# Altium PCB SFY_ADA_4G_PCB.PcbDoc (part 1 of 2)
Units mm, origin at the board's own origin, x right, y up, seen from the top; angles counter-clockwise.
Board outline 69 x 58.5 mm, 4 copper layers (Top Layer, Layer 2, Layer 3, Bottom Layer), stack 1.74 mm thick; 131 components, 96 nets, 524 pads, 176 vias.
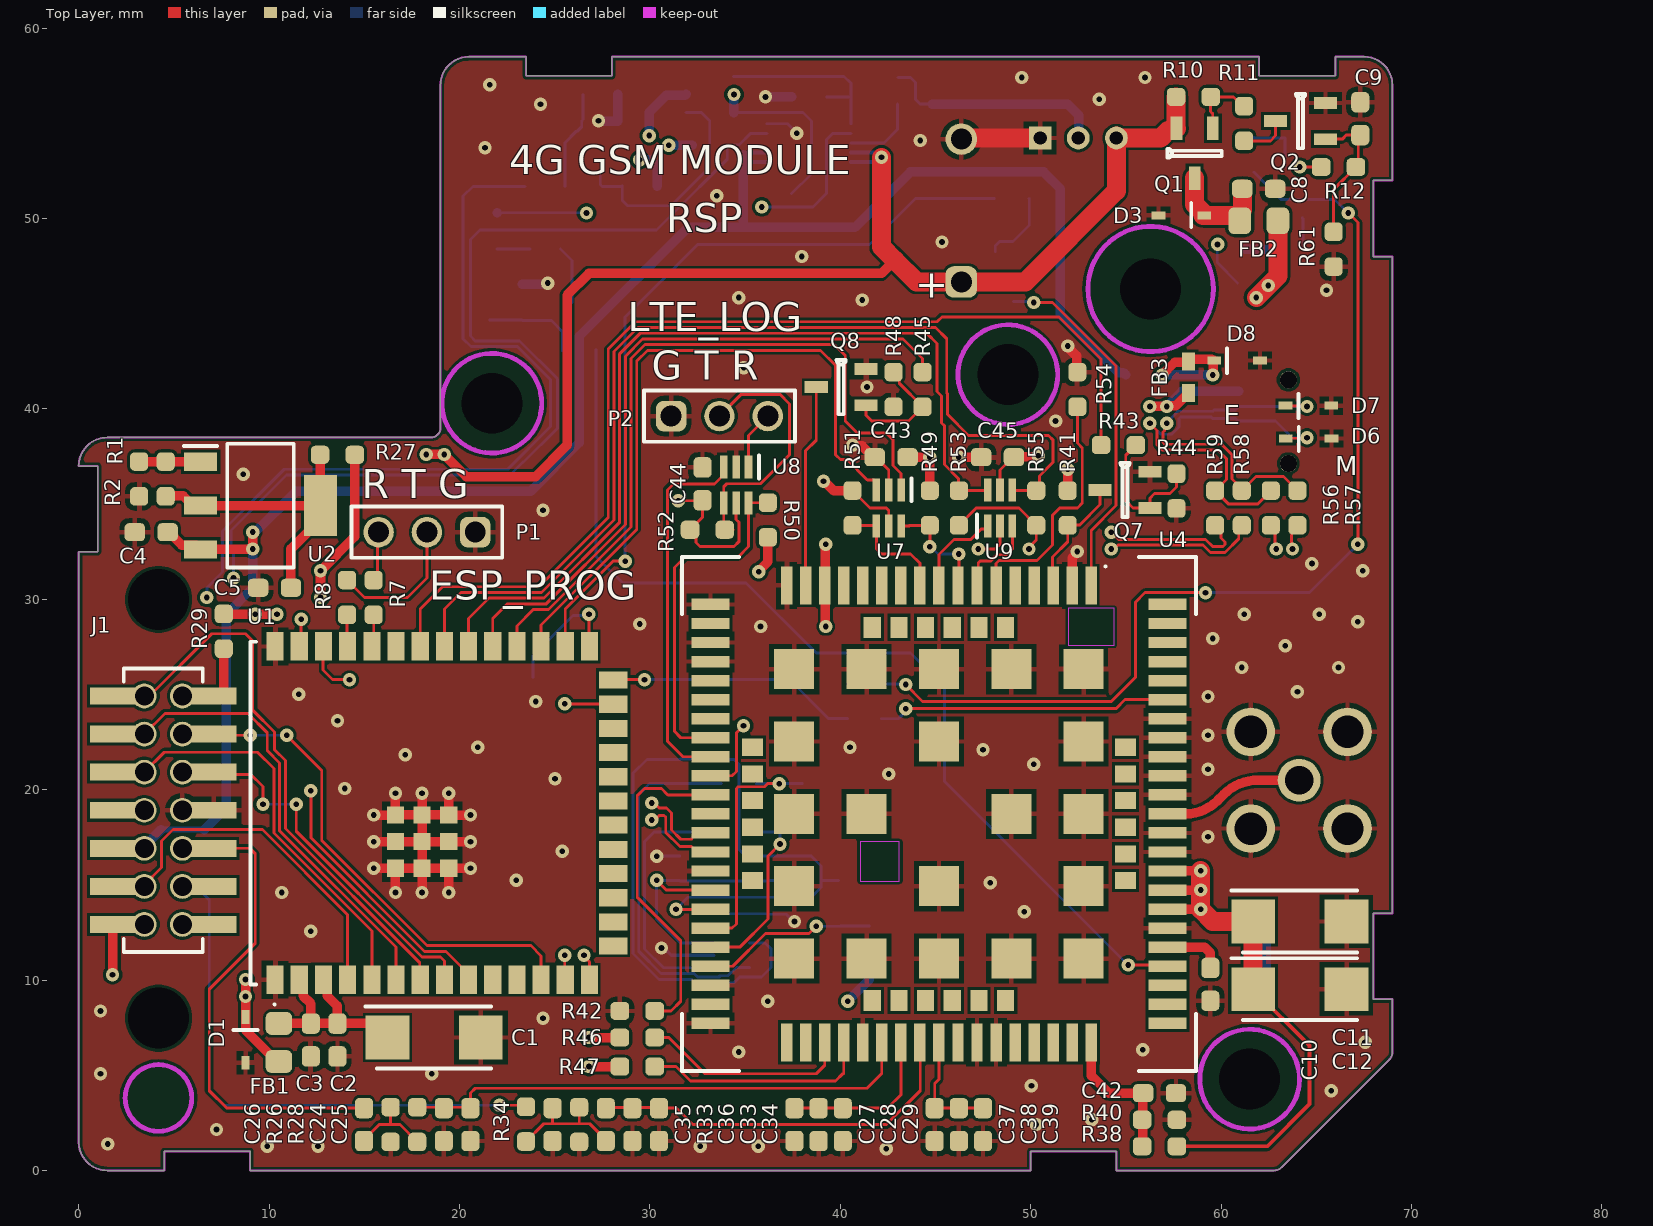
[diagram p0: Top Layer view]
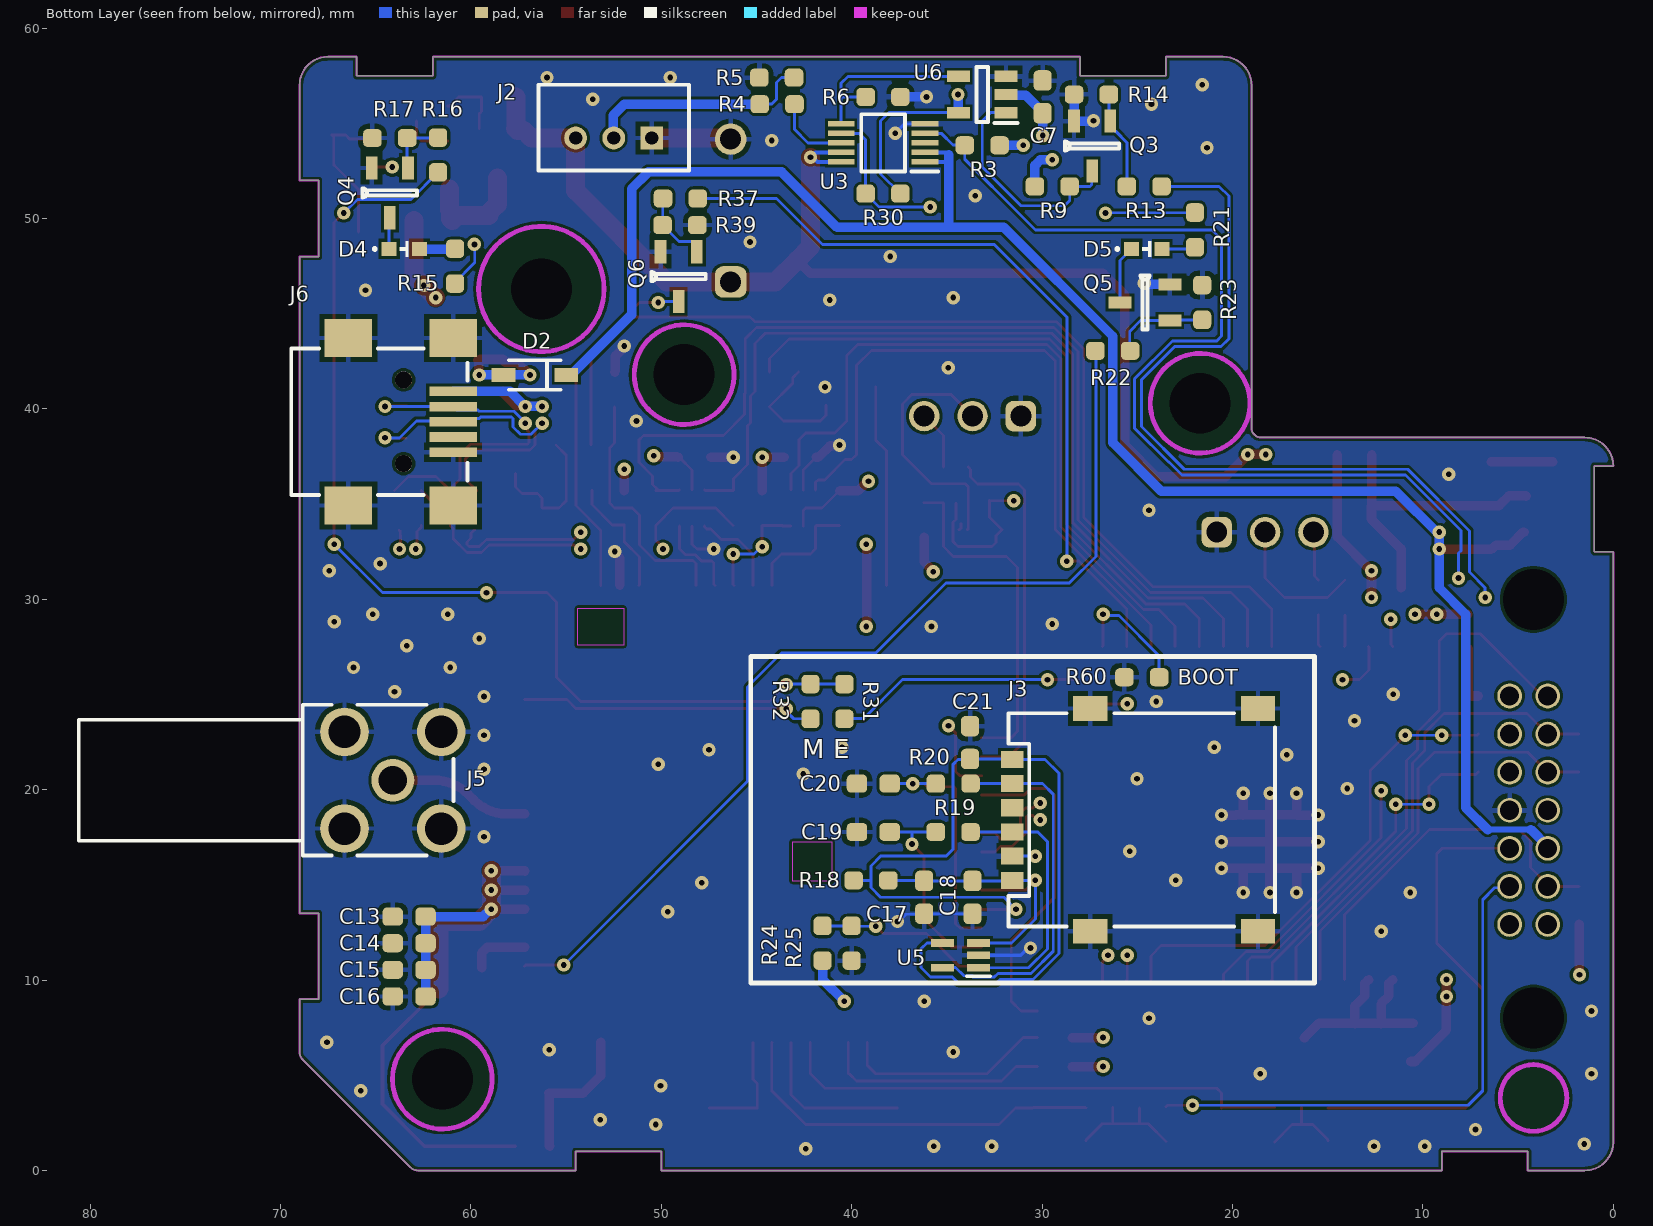
[diagram p1: Bottom Layer view, seen from below]
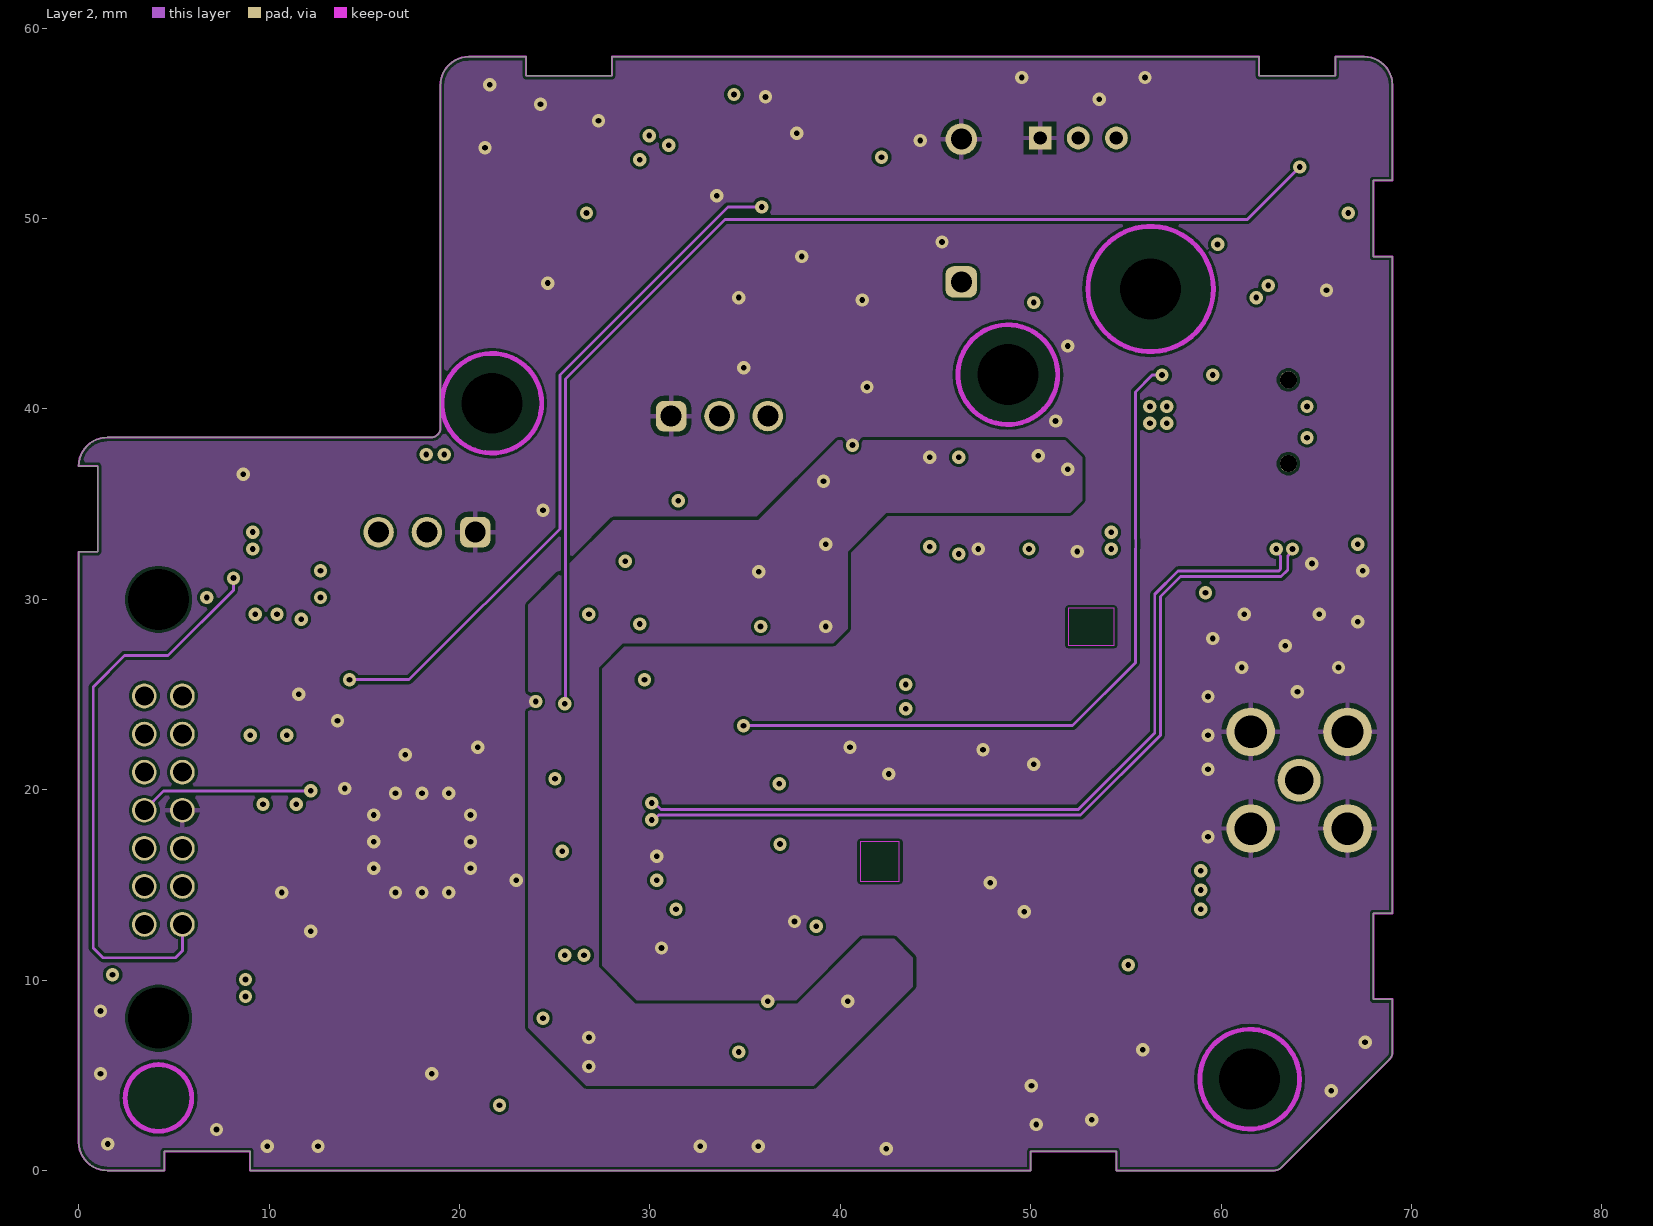
[diagram p2: Layer 2]
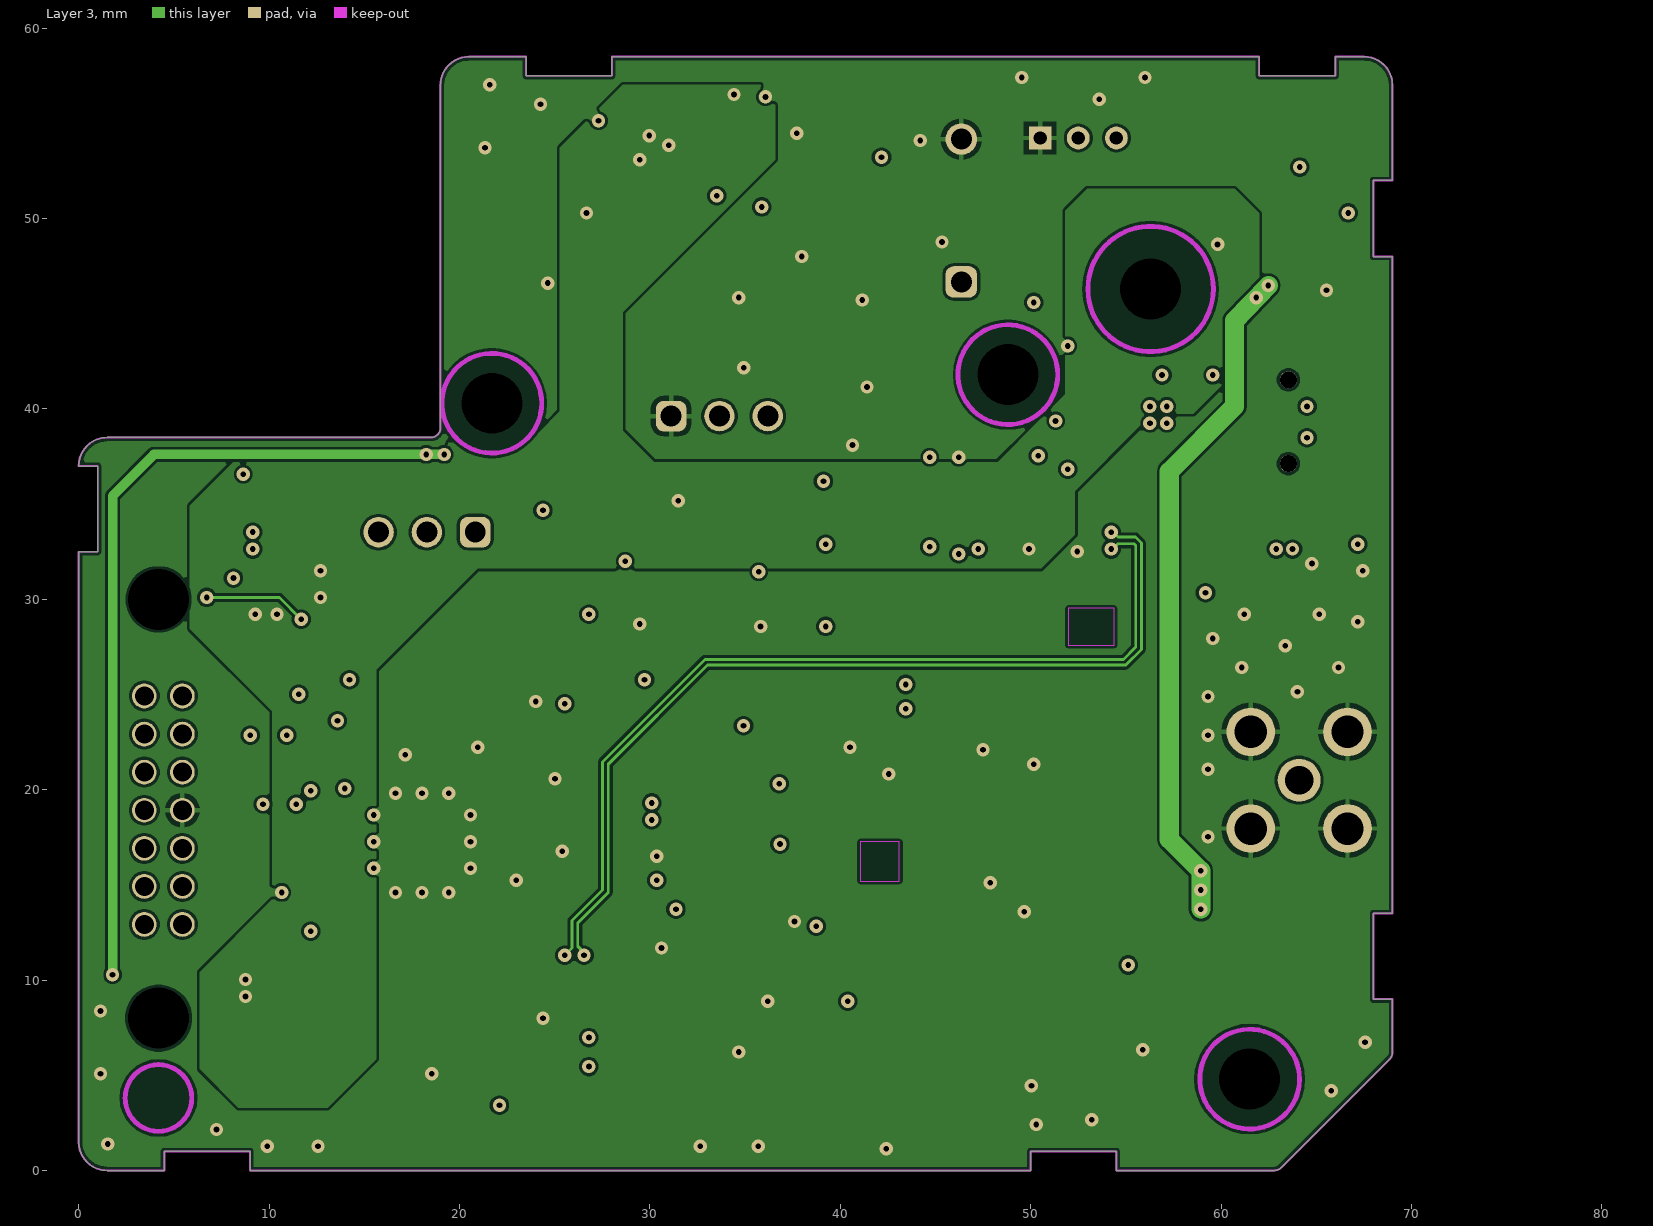
[diagram p3: Layer 3]
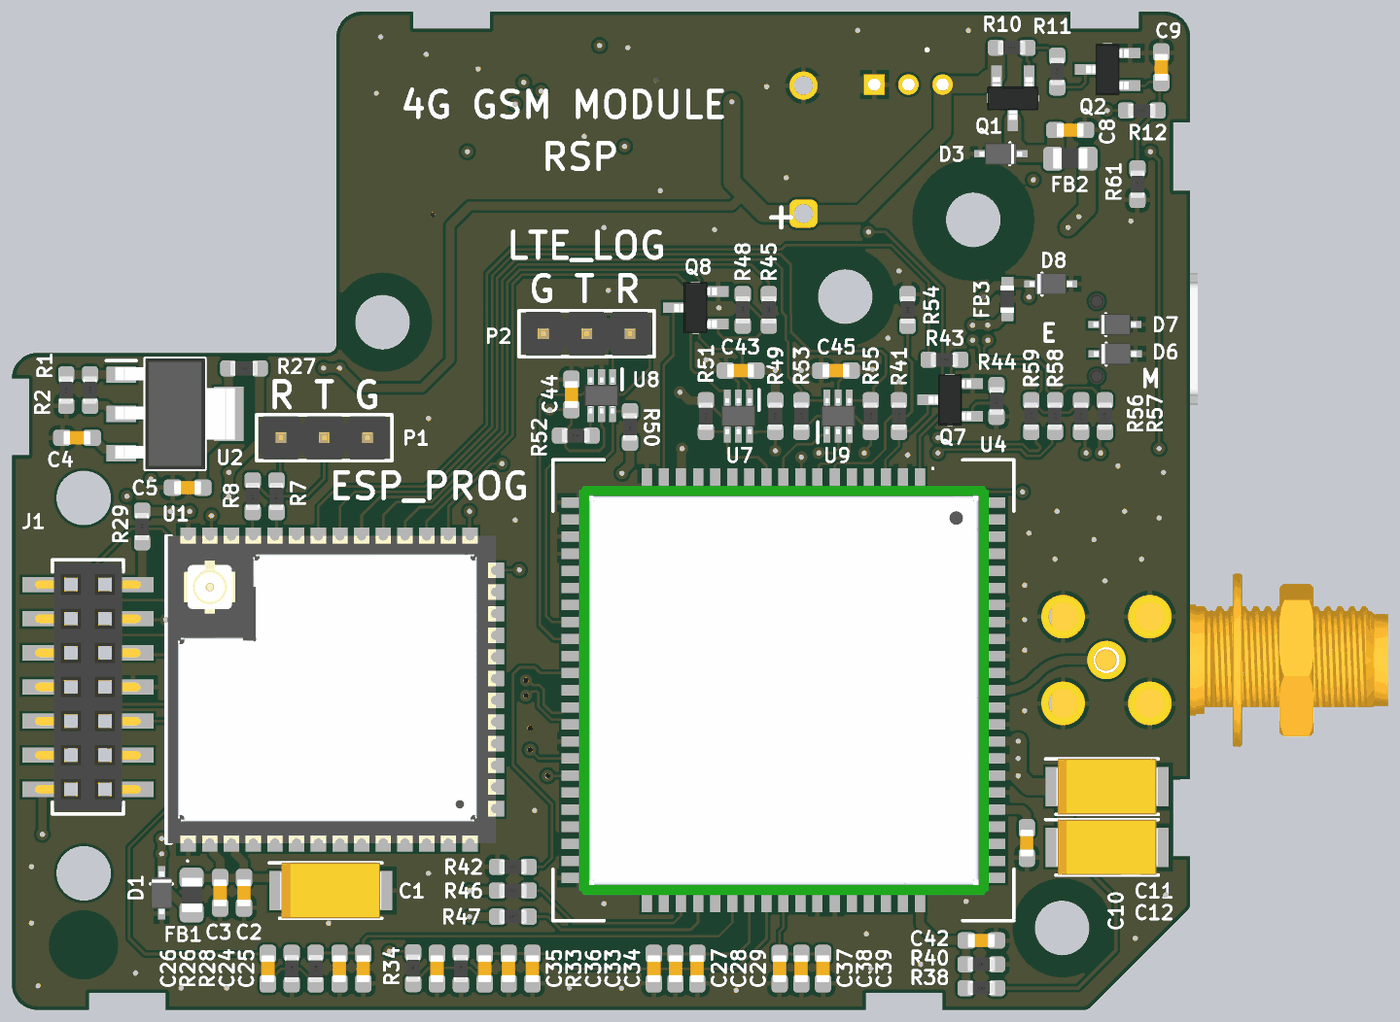
[diagram p5: 3D render of the assembled board from above, using the file's embedded part models]
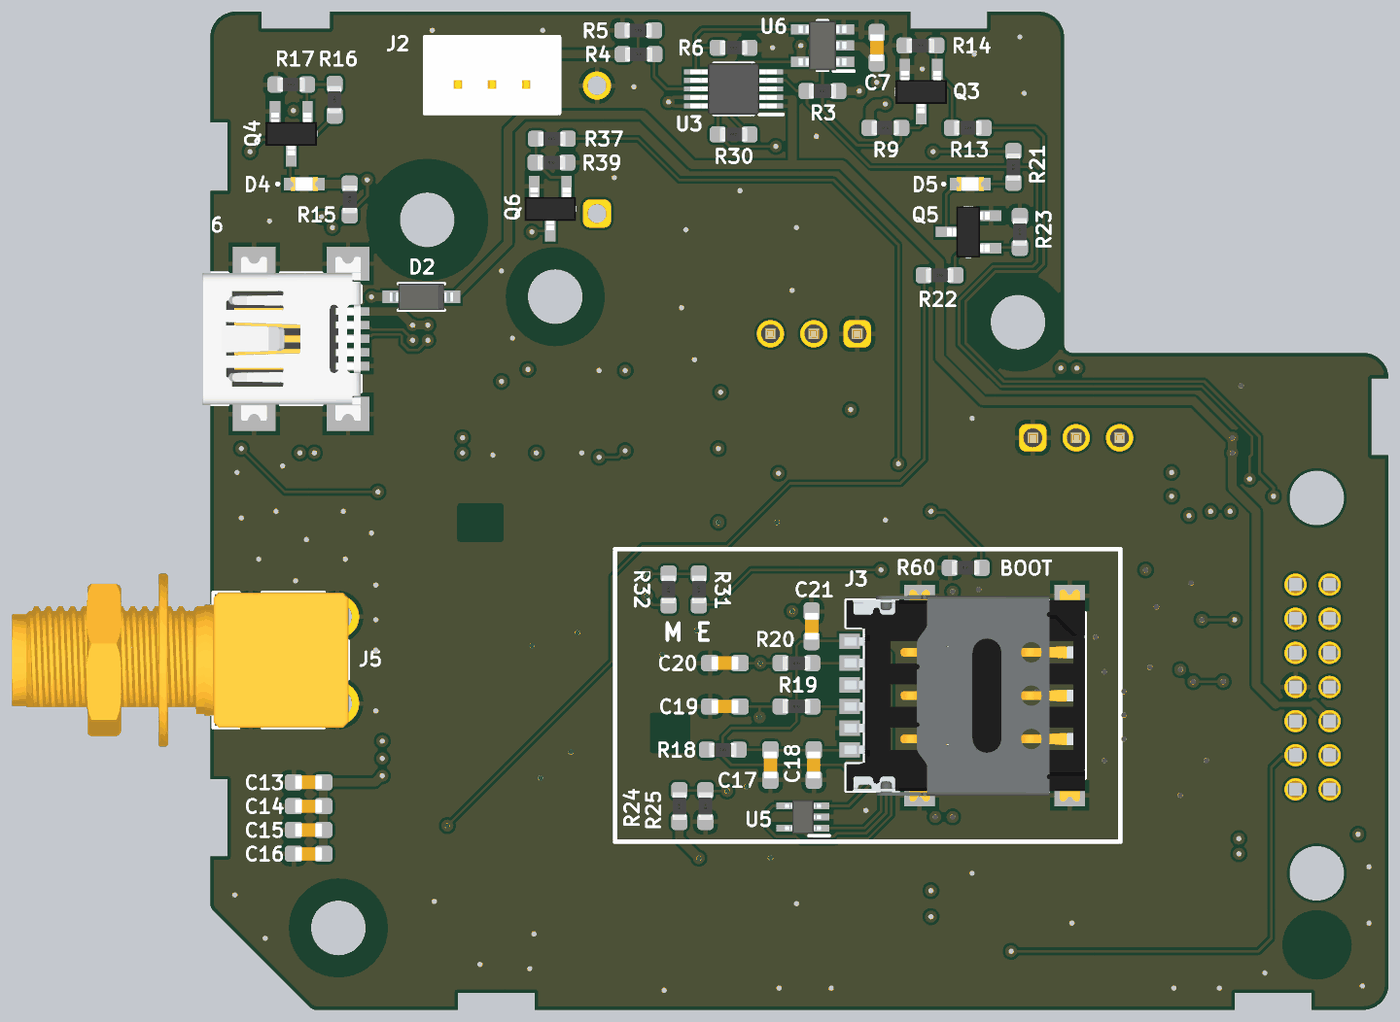
[diagram p6: 3D render of the assembled board from below, using the file's embedded part models]

## Layer stack, top to bottom
Top Solder: solder mask 0.01, Solder Resist, Dk 3.5
Top Layer: signal copper 0.035
Dielectric 2: prepreg 0.3, PP-006, Dk 4.1
Layer 2: signal copper 0.035
Dielectric 1: dielectric 1, FR-4, Dk 4.8
Layer 3: signal copper 0.035
Dielectric 3: prepreg 0.3, PP-006, Dk 4.1
Bottom Layer: signal copper 0.035
Bottom Solder: solder mask 0.01, Solder Resist, Dk 3.5

## Board outline
0,32.5 1,32.5 1,37 0,37 cw(c1.5,37) 1.5,38.5 18.5,38.5 ccw(c18.5,39) 19,39 19,57 cw(c20.5,57) 20.5,58.5 23.5,58.5 23.5,57.5 28,57.5 28,58.5 62,58.5 62,57.5 66,57.5 66,58.5 67.5,58.5 cw(c67.5,57) 69,57 69,52 68,52 68,48 69,48 69,13.5 68,13.5 68,9 69,9 69,6.205 cw(c68.5,6.205) 68.854,5.851 68.853,5.852 63.148,0.146 cw(c62.794,0.5) 62.794,0 54.5,0 54.5,1 50,1 50,0 9,0 9,1 4.5,1 4.5,0 1.5,0 cw(c1.5,1.5) 0,1.5

## Design rules (kind name [scope] priority, off if disabled: settings)
Clearance [All] p1: gap=0.15 ignorepadtopadclearanceinfootprint=FALSE
HoleSize [All] p1: absolutevalues=TRUE maxlimit=5 minlimit=0.3 maxpercent=80.000 minpercent=20.000
MinimumSolderMaskSliver [All] p1: minsoldermaskwidth=0.15
PolygonConnect [All] p1: connectstyle=Relief reliefconductorwidth=0.254 reliefentries=4 polygonreliefangle="90 Angle" airgapwidth=0.254
RoutingVias [All] p1: holewidth=0.3 width=0.7 viastyle="Through Hole" minholewidth=0.3 minwidth=0.7 maxholewidth=0.711 maxwidth=1.27
SilkToSilkClearance [All] p1: silktosilkclearance=0.15
SilkToSolderMaskClearance [IsPad] p1: minsilkscreentomaskgap=0.15 clearancetoexposedcopper=TRUE
SolderMaskExpansion [All] p1: expansion=0 istentingtop=FALSE
SupplyNets "Schematic Supply Nets_7" [InNet('+1.8V')] p1: voltage=0.000
SupplyNets "Schematic Supply Nets_6" [InNet('VBAT_MOD')] p2: voltage=0.000
SupplyNets "Schematic Supply Nets_5" [InNet('V_USB')] p3: voltage=0.000
SupplyNets "Schematic Supply Nets_4" [InNet('+3.3V')] p4: voltage=0.000
SupplyNets "Schematic Supply Nets_3" [InNet('VBAT')] p5: voltage=0.000
SupplyNets "Schematic Supply Nets_2" [InNet('GND')] p6: voltage=0.000
SupplyNets "Schematic Supply Nets_1" [InNet('VBAT_A')] p7: voltage=0.000
SupplyNets "Schematic Supply Nets" [InNet('VEXT_4.5V')] p8: voltage=0.000
Width [All] p1: maxlimit=3 minlimit=0.15 preferedwidth=0.15
26 further rules are at their usual default settings.

## Classes and differential pairs
component class 01_ESP: C1 C2 C3 D1 FB1 P1 R7 R8 R60 U1
component class 03_MODEM_2: C42 C43 C44 C45 D6 D7 D8 FB3 J5 J6 P2 Q6 Q7 Q8 R37 R38 R39 R40 R41 R42 R43 R44 R45 R46 R47 R48 R49 R50 R51 R52 R53 R54 R55 R56 R57 R58 R59 U7 U8 U9
component class 02_MODEM_1: C10 C11 C12 C13 C14 C15 C16 C17 C18 C19 C20 C21 C24 C25 C26 C27 C28 C29 C33 C34 C35 C36 C37 C38 C39 D3 D4 D5 FB2 J3 Q4 Q5 R15 R16 R17 R18 R19 R20 R21 R22 R23 R24 R25 R26 R28 R31 R32 R33 R34 U4 U5
component class 00_CHG_POWER: C4 C5 C7 C8 C9 D2 J1 J2 Q1 Q2 Q3 R1 R2 R3 R4 R5 R6 R9 R10 R11 R12 R13 R14 R27 R29 R30 R61 U2 U3 U6

## Components (designator, comment, footprint, x,y, rotation, side; value= is the part's Value field where it differs from the comment)
C1 "TPSC107K010S0075" CAPPM6032X280N 18.669,6.985 r0 top
C2 "1uF" C_0603_H_0.8_M 13.589,6.858 r270 top
C3 "100nF" C_0603_H_0.8_M 12.192,6.858 r270 top
C4 "100nF" C_0603_H_0.8_M 3.81,33.528 r180 top
C5 "100nF" C_0603_H_0.8_M 10.287,30.607 r180 top
C7 "100nF" C_0603_H_0.8_M 29.972,56.388 r270 bottom
C8 "33pF" C_0603_H_0.8_M 61.976,51.562 r180 top
C9 "33pF" C_0603_H_0.8_M 67.31,55.245 r270 top
C10 "10pF" C_0603_H_0.8_M 59.436,9.779 r270 top
C11 "TPSC107K010S0075" CAPPM6032X280N 64.135,13.081 r0 top
C12 "TPSC107K010S0075" CAPPM6032X280N 64.135,9.525 r0 top
C13 "10pF" C_0603_H_0.8_M 63.246,13.335 r0 bottom
C14 "33pF" C_0603_H_0.8_M 63.246,11.938 r0 bottom
C15 "33pF" C_0603_H_0.8_M 63.246,10.541 r0 bottom
C16 "1uF" C_0603_H_0.8_M 63.246,9.144 r0 bottom
C17 "33pF" C_0603_H_0.8_M 36.195,14.351 r90 bottom
C18 "100nF" C_0603_H_0.8_M 33.655,14.351 r90 bottom
C19 "33pF" C_0603_H_0.8_M 38.862,17.78 r0 bottom
C20 "33pF" C_0603_H_0.8_M 38.862,20.32 r0 bottom
C21 "33pF" C_0603_H_0.8_M 33.782,22.479 r270 bottom
C24 "NC" C_0603_H_0.8_M 19.177,2.413 r270 top
C25 "33pF" C_0603_H_0.8_M 20.574,2.413 r270 top
C26 "100nF" C_0603_H_0.8_M 14.986,2.413 r90 top
C27 "NC" C_0603_H_0.8_M 37.592,2.413 r90 top
C28 "33pF" C_0603_H_0.8_M 38.862,2.413 r90 top
C29 "120nF" C_0603_H_0.8_M 40.132,2.413 r90 top
C33 "NC" C_0603_H_0.8_M 29.083,2.413 r270 top
C34 "33pF" C_0603_H_0.8_M 30.48,2.413 r270 top
C35 "120nF" C_0603_H_0.8_M 24.892,2.413 r270 top
C36 "33pF" C_0603_H_0.8_M 27.686,2.413 r90 top
C37 "NC" C_0603_H_0.8_M 44.958,2.413 r90 top
C38 "33pF" C_0603_H_0.8_M 46.228,2.413 r90 top
C39 "120nF" C_0603_H_0.8_M 47.498,2.413 r90 top
C42 "1uF" C_0603_H_0.8_M 56.769,4.064 r180 top
C43 "100nF" C_0603_H_0.8_M 42.672,37.465 r0 top
C44 "100nF" C_0603_H_0.8_M 32.766,36.068 r270 top
C45 "100nF" C_0603_H_0.8_M 48.26,37.465 r0 top
D1 "XBP1013-G" SOD-323-2 8.763,6.858 r270 top
D2 "PMEG2010ER" SOD3716X135N 56.642,41.783 r0 bottom
D3 "XBP1013-G" SOD-323-2 57.912,50.165 r180 top
D4 "Green, 3.2V, 140°" WL-SMCD_0603 63.5,48.4 r180 bottom locked
D5 "Green, 3.2V, 140°" WL-SMCD_0603 24.5,48.4 r180 bottom locked
D6 "XBP1013-G" SOD-323-2 64.601,38.443 r0 top
D7 "XBP1013-G" SOD-323-2 64.587,40.167 r0 top
D8 "XBP1013-G" SOD-323-2 60.84,42.545 r0 top
FB1 "BLM21PG300SN1D" F_0805_H_1.1_M 10.541,6.731 r90 top
FB2 "BLM21PG300SN1D" F_0805_H_1.1_M 61.976,49.911 r180 top
FB3 "600Ω" WE-CBF_0603_L1.6W0.8H0.8_HC 58.293,41.656 r90 top
J1 "621014242921" 621014242921 4.445,18.923 r90 top
J2 "B3B-PH-K-S" B3BPHKS 50.5,54.229 r180 bottom
J3 "693042010611" 693042010611 24.765,18.415 r90 bottom locked
J5 "60311042114502" 60311042114502 64.1,20.5 r270 bottom locked
J6 "65100516121" 65100516121 64.809,39.326 r270 bottom locked
P1 "61300311121" 61300311121 18.288,33.528 r180 top
P2 "61300311121" 61300311121 33.655,39.624 r0 top
Q1 "SI2369" SOT23-3 59.563,54.737 r90 top
Q2 "SI2300" SOT23-3 65.485,54.168 r0 top
Q3 "SI2300" SOT23-3 26.421,55.118 r90 bottom
Q4 "SI2300" SOT23-3 63.312,52.658 r90 bottom
Q5 "SI2300" SOT23-3 23.288,44.643 r180 bottom
Q6 "SI2300" SOT23-3 48.138,48.26 r90 bottom
Q7 "SI2300" SOT23-3 56.261,34.798 r0 top
Q8 "SI2300" SOT23-3 41.355,40.198 r0 top
R1 "NC" R_0603_H_0.45_M 4.572,36.322 r270 top
R2 "0R" R_0603_H_0.45_M 3.175,36.322 r90 top
R3 "4.7K" R_0603_H_0.45_M 33.147,53.848 r180 bottom
R4 "8.2K" R_0603_H_0.45_M 43.918,56.007 r0 bottom
R5 "10K" R_0603_H_0.45_M 43.942,57.404 r180 bottom
R6 "2.2K" R_0603_H_0.45_M 38.354,56.388 r180 bottom
R7 "100R" R_0603_H_0.45_M 15.494,30.099 r90 top
R8 "100R" R_0603_H_0.45_M 14.097,30.099 r90 top
R9 "10K" R_0603_H_0.45_M 29.464,51.689 r180 bottom
R10 "47K" R_0603_H_0.45_M 58.547,56.388 r180 top
R11 "4.7K" R_0603_H_0.45_M 61.214,54.991 r270 top
R12 "100R" R_0603_H_0.45_M 66.167,52.705 r180 top
R13 "100R" R_0603_H_0.45_M 24.638,51.689 r0 bottom
R14 "NC" R_0603_H_0.45_M 27.408,56.515 r0 bottom
R15 "220R" R_0603_H_0.45_M 60.833,47.498 r90 bottom
R16 "100R" R_0603_H_0.45_M 61.722,53.34 r90 bottom
R17 "NC" R_0603_H_0.45_M 64.262,54.229 r0 bottom
R18 "4.7K" R_0603_H_0.45_M 38.989,15.24 r0 bottom
R19 "22R" R_0603_H_0.45_M 34.671,17.78 r180 bottom
R20 "22R" R_0603_H_0.45_M 34.671,20.32 r180 bottom
R21 "220R" R_0603_H_0.45_M 21.971,49.403 r270 bottom
R22 "100R" R_0603_H_0.45_M 26.289,43.053 r180 bottom
R23 "NC" R_0603_H_0.45_M 21.59,45.593 r90 bottom
R24 "NC" R_0603_H_0.45_M 41.529,11.938 r90 bottom
R25 "NC" R_0603_H_0.45_M 40.005,11.938 r90 bottom
R26 "4.7K" R_0603_H_0.45_M 16.383,2.413 r90 top
R27 "0R" R_0603_H_0.45_M 13.589,37.592 r180 top
R28 "220R" R_0603_H_0.45_M 17.78,2.413 r90 top
R29 "NC" R_0603_H_0.45_M 7.62,28.321 r270 top
R30 "4.7K" R_0603_H_0.45_M 38.354,51.308 r180 bottom
R31 "0R" R_0603_H_0.45_M 40.386,24.638 r90 bottom
R32 "NC" R_0603_H_0.45_M 42.164,24.638 r90 bottom
R33 "3.3K" R_0603_H_0.45_M 26.289,2.413 r90 top
R34 "18K" R_0603_H_0.45_M 23.495,2.437 r90 top
R37 "100R" R_0603_H_0.45_M 48.998,51.054 r0 bottom
R38 "680K" R_0603_H_0.45_M 56.769,1.27 r0 top
R39 "NC" R_0603_H_0.45_M 49.022,49.657 r180 bottom
R40 "470K" R_0603_H_0.45_M 56.769,2.667 r0 top
R41 "4.7K" R_0603_H_0.45_M 51.943,34.798 r90 top
R42 "10K" R_0603_H_0.45_M 29.337,8.382 r0 top
R43 "100R" R_0603_H_0.45_M 54.61,38.1 r0 top
R44 "NC" R_0603_H_0.45_M 57.658,35.687 r270 top
R45 "100R" R_0603_H_0.45_M 44.323,41.021 r270 top
R46 "4.7K" R_0603_H_0.45_M 29.337,6.985 r0 top
R47 "4.7K" R_0603_H_0.45_M 29.337,5.461 r0 top
R48 "NC" R_0603_H_0.45_M 42.799,41.021 r270 top
R49 "4.7K" R_0603_H_0.45_M 44.704,34.798 r90 top
R50 "4.7K" R_0603_H_0.45_M 36.195,34.163 r270 top
R51 "4.7K" R_0603_H_0.45_M 40.64,34.798 r90 top
R52 "4.7K" R_0603_H_0.45_M 33.02,33.655 r180 top
R53 "4.7K" R_0603_H_0.45_M 46.228,34.798 r270 top
R54 "NC" R_0603_H_0.45_M 52.451,41.021 r270 top
R55 "4.7K" R_0603_H_0.45_M 50.292,34.798 r270 top
R56 "NC" R_0603_H_0.45_M 62.611,34.798 r270 top
R57 "NC" R_0603_H_0.45_M 64.008,34.798 r270 top
R58 "0R" R_0603_H_0.45_M 61.087,34.798 r90 top
R59 "0R" R_0603_H_0.45_M 59.69,34.798 r90 top
R60 "NC" R_0603_H_0.45_M 24.765,25.908 r0 bottom
R61 "10K" R_0603_H_0.45_M 65.913,48.387 r270 top
U1 "ESP32-S3-WROOM-1" ESP32-S3-WROOM-1U 28.327,9.775 r90 top locked
U2 "LM1117-33" SOT230P700X180-4N 9.55,34.925 r0 top
U3 "MCP73833-AMI_UN" SOP50P490X110-10N 38.354,53.975 r0 bottom
U4 "A7670E" A7670CLNSC 57.181,30.731 r270 top locked
U5 "ESDA6V1W5" SOT65P210X110-5N 34.29,11.303 r0 bottom
U6 "74LVC1G125DBVRE4" SOT95P280X145-5N 33.147,56.515 r0 bottom
U7 "NC7WZ07P6" SOT65P210X110-6N 42.545,34.798 r270 top
U8 "NC7WZ07P6" SOT65P210X110-6N 34.529,36.002 r270 top
U9 "NC7WZ07P6" SOT65P210X110-6N 48.387,34.798 r90 top

## Footprints (in the part's own frame and the unit in brackets; to place one, negate y for a bottom-side part, rotate by r counter-clockwise, add the part's x,y. Pads: shape width x height; smd on the part's side, far side on the other; paste and mask are expansions set on the pad)
61300311121 [mm] "Pin Header, pitch 2.54 mm, THT, Vertical, single row, 3p"
  rrect50% 1.6x1.6 hole 1.1: 1(-2.54,0)
  round 1.6 hole 1.1: 2(0,0) 3(2.54,0)
  silkscreen extent -3.96,-1.35 3.96,1.35, body extent -3.81,-1.27 3.81,1.27, height 8.57
65100516121 [mm] "Mini USB 2.0 Type B SMT Horizontal 5 Contacts"
  rect 0.5x2.5 smd: 1(-1.6,3.875) 2(-0.8,3.875) 3(0,3.875) 4(0.8,3.875) 5(1.6,3.875)
  round 0.9 hole 0.9 unplated: MH1(-2.2,1.275) MH2(2.2,1.275)
  rect 2x2.5 smd: Shell(-4.4,-1.625) Shell(-4.4,3.875) Shell(4.4,-1.625) Shell(4.4,3.875)
  silkscreen extent -3.85,-4.62 3.85,4.62, body extent -4.8,-4.62 4.8,4.63, height 3.92
621014242921 [mm] "Socket Header, Pitch 2.00 mm, SMT, Vertical, dual row, 14p"
  rect 0.89x2.4 smd: 1(-6,-2.65) 2(-6,2.65) 3(-4,-2.65) 4(-4,2.65) 5(-2,-2.65) 6(-2,2.65) 7(0,-2.65) 8(0,2.65) 9(2,-2.65) 10(2,2.65) 11(4,-2.65) 12(4,2.65) 13(6,-2.65) 14(6,2.65)
  round 1.3 hole 1: M1(-6,-1) M2(-6,1) M3(-4,-1) M4(-4,1) M5(-2,-1) M6(-2,1) M7(0,-1) M8(0,1) M9(2,-1) M10(2,1) M11(4,-1) M12(4,1) M13(6,-1) M14(6,1)
  silkscreen extent -7.45,-2.07 7.45,2.08, body extent -7.25,-3.1 7.25,3.1, height 4.6
693042010611 [mm] "NanoSIM Hinge SMT"
  rect 0.9x1.2 smd: C1(-3.175,6.8) C2(-0.635,6.8) C3(1.905,6.8) C5(-1.905,6.8) C6(0.635,6.8) C7(3.175,6.8)
  rect 1.3x1.8 smd: Shell(-5.85,-6.1) Shell(-5.85,2.7) Shell(5.85,-6.1) Shell(5.85,2.7)
  silkscreen extent -5.6,-7 5.6,7, body extent -6.2,-7 6.2,7.1, height 1.51
60311042114502 [mm] "SMA PCB THT Jack Right Angle  Rear Mount Bulkhead"
  round 2.25 hole 1.5: 1(0,0)
  round 2.55 hole 1.7: 2(-2.54,2.54) 3(2.54,2.54) 4(2.54,-2.54) 5(-2.54,-2.54)
  silkscreen extent -3.96,-16.5 3.96,3.19, body extent -5.09,-16.5 5.1,3.19, height 12.16
A7670CLNSC [mm]
  rect 2x0.6 smd: 1(0,-4) 2(0,-5) 3(0,-6) 4(0,-7) 5(0,-8) 6(0,-9) 7(0,-10) 8(0,-11) 9(0,-12) 10(0,-13) 11(0,-14) 12(0,-15) 13(0,-16) 14(0,-17) 15(0,-18) 16(0,-19) 17(0,-20) 35(24,-20) 36(24,-19) 37(24,-18) 38(24,-17) 39(24,-16) 40(24,-15) 41(24,-14) 42(24,-13) 43(24,-12) 44(24,-11) 45(24,-10) 46(24,-9) 47(24,-8) 48(24,-7) 49(24,-6) 50(24,-5) 51(24,-4)
  rect 0.6x2 smd: 18(4,-24) 19(5,-24) 20(6,-24) 21(7,-24) 22(8,-24) 23(9,-24) 24(10,-24) 25(11,-24) 26(12,-24) 27(13,-24) 28(14,-24) 29(15,-24) 30(16,-24) 31(17,-24) 32(18,-24) 33(19,-24) 34(20,-24) 52(20,0) 53(19,0) 54(18,0) 55(17,0) 56(16,0) 57(15,0) 58(14,0) 59(13,0) 60(12,0) 61(11,0) 62(10,0) 63(9,0) 64(8,0) 65(7,0) 66(6,0) 67(5,0) 68(4,0) 89(1,-24) 90(2,-24) 91(3,-24) 92(21,-24) 93(22,-24) 94(23,-24) 95(23,0) 96(22,0) 97(21,0) 98(3,0) 99(2,0) 100(1,0)
  rect 2.1x2.1 smd: 69(4.4,-4.4) 70(4.4,-8.2) 71(4.4,-12) 72(4.4,-15.8) 73(4.4,-19.6) 74(8.2,-19.6) 75(12,-19.6) 76(15.8,-19.6) 77(19.6,-19.6) 78(19.6,-15.8) 79(19.6,-12) 80(19.6,-8.2) 81(19.6,-4.4) 82(15.8,-4.4) 83(12,-4.4) 84(8.2,-4.4) 85(8.2,-12) 86(12,-15.8) 87(15.8,-12) 88(12,-8.2)
  rect 1.1x0.9 smd: 101(2.2,-8.5) 102(2.2,-9.9) 103(2.2,-11.3) 104(2.2,-12.7) 105(2.2,-14.1) 106(2.2,-15.5) 113(21.8,-15.5) 114(21.8,-14.1) 115(21.8,-12.7) 116(21.8,-11.3) 117(21.8,-9.9) 118(21.8,-8.5)
  rect 0.9x1.1 smd: 107(8.5,-21.8) 108(9.9,-21.8) 109(11.3,-21.8) 110(12.7,-21.8) 111(14.1,-21.8) 112(15.5,-21.8) 119(15.5,-2.2) 120(14.1,-2.2) 121(12.7,-2.2) 122(11.3,-2.2) 123(9.9,-2.2) 124(8.5,-2.2)
  Keep-Out Layer region: 1.2,-5.2 3.15,-5.2 3.15,-2.8 1.2,-2.8
  Keep-Out Layer region: 13.475,-16.125 15.525,-16.125 15.525,-14.075 13.475,-14.075
  silkscreen extent -1.5,-25.5 25.5,1.5, body extent 0.01,-23.98 24.01,0.02, height 2.7
B3BPHKS [mm]
  rect 1.2x1.2 hole 0.7: 1(0,0)
  round 1.2 hole 0.7: 2(-2,0) 3(-4,0)
  silkscreen extent -5.95,-1.7 1.95,2.8, body extent -5.95,-1.7 1.95,2.8, height 6
C_0603_H_0.8_M [mm] "Ceramic Capacitors, body 1.6x0.8mm"
  rrect50% 1.075x0.95 smd: 1(0.863,0) 2(-0.863,0)
  body extent -0.8,-0.4 0.8,0.4, height 0.8
CAPPM6032X280N [mm]
  rect 2.3x2.3 smd: 1(-2.45,0) 2(2.45,0)
  silkscreen extent -3.6,-1.63 3,1.63, body extent -3,-1.63 3,1.63, height 2.8
ESP32-S3-WROOM-1U [mm]
  rect 1.5x0.9 smd: 1(0.25,18.01) 2(0.25,16.74) 3(0.25,15.47) 4(0.25,14.2) 5(0.25,12.93) 6(0.25,11.66) 7(0.25,10.39) 8(0.25,9.12) 9(0.25,7.85) 10(0.25,6.58) 11(0.25,5.31) 12(0.25,4.04) 13(0.25,2.77) 14(0.25,1.5) 27(17.75,1.5) 28(17.75,2.77) 29(17.75,4.04) 30(17.75,5.31) 31(17.75,6.58) 32(17.75,7.85) 33(17.75,9.12) 34(17.75,10.39) 35(17.75,11.66) 36(17.75,12.93) 37(17.75,14.2) 38(17.75,15.47) 39(17.75,16.74) 40(17.75,18.01)
  rect 0.9x1.5 smd: 15(2.015,0.25) 16(3.285,0.25) 17(4.555,0.25) 18(5.825,0.25) 19(7.095,0.25) 20(8.365,0.25) 21(9.635,0.25) 22(10.905,0.25) 23(12.175,0.25) 24(13.445,0.25) 25(14.715,0.25) 26(15.992,0.25)
  rect 0.9x0.9 smd: 41(7.5,8.89) 42(8.9,8.89) 43(8.9,10.29) 44(8.9,11.69) 45(7.5,11.69) 46(6.1,11.69) 47(6.1,10.29) 48(6.1,8.89) 49(7.5,10.29)
  silkscreen extent -1.1,17.99 18,19.3, body extent 0,0 18,19.2, height 3.35
F_0805_H_1.1_M [mm] "SMD EMI Suppression Ferrite  Bead, body 2.00x1.20mm"
  rrect50% 1.2x1.4 smd: 1(-1.004,0.025) 2(0.996,0.025)
  body extent -1,-0.6 1,0.6, height 0.9
R_0603_H_0.45_M [mm] "Thick Film Resistors, SMT, body size 1.60 x 0.80 mm"
  rrect50% 0.975x0.95 smd: 1(-0.913,0) 2(0.913,0)
  body extent -0.8,-0.4 0.8,0.4, height 0.45
SOD3716X135N [mm]
  rect 1.25x0.75 smd: 1(-1.65,0) 2(1.65,0)
  silkscreen extent -1.35,-0.77 1.35,0.77, body extent -1.85,-0.77 1.85,0.77, height 1.35
SOD-323-2 [mm]
  rect 0.72x0.42 smd: 1(1.2,0) 2(-1.2,0)
  silkscreen extent -0.53,-0.65 -0.53,0.63, body extent -1.25,-0.63 1.25,0.63, height 0.95
SOP50P490X110-10N [mm]
  rect 1.4x0.3 smd: 1(-2.2,1) 2(-2.2,0.5) 3(-2.2,0) 4(-2.2,-0.5) 5(-2.2,-1) 6(2.2,-1) 7(2.2,-0.5) 8(2.2,0) 9(2.2,0.5) 10(2.2,1)
  silkscreen extent -2.9,-1.5 1.15,1.5, body extent -2.52,-1.5 2.52,1.5, height 1.1
SOT23-3 [mm]
  rect 1.22x0.62 smd: 1(0,0) 2(0,1.9) 3(-2.62,0.95)
  silkscreen extent -1.55,-0.48 -1.07,2.38, body extent -2.58,-0.55 -0.08,2.45, height 1.1
SOT65P210X110-5N [mm]
  rect 1.2x0.4 smd: 1(-0.95,0.65) 2(-0.95,0) 3(-0.95,-0.65) 4(0.95,-0.65) 5(0.95,0.65)
  silkscreen extent -1.55,1.1 -0.35,1.1, body extent -1.05,-1 1.05,1, height 1.1
SOT65P210X110-6N [mm]
  rect 1.2x0.4 smd: 1(-0.95,0.65) 2(-0.95,0) 3(-0.95,-0.65) 4(0.95,-0.65) 5(0.95,0) 6(0.95,0.65)
  silkscreen extent -1.55,1.2 -0.35,1.2, body extent -1.05,-1 1.05,1, height 1.1
SOT95P280X145-5N [mm]
  rect 1.2x0.6 smd: 1(-1.25,0.95) 2(-1.25,0) 3(-1.25,-0.95) 4(1.25,-0.95) 5(1.25,0.95)
  silkscreen extent -1.85,-1.45 0.3,1.5, body extent -1.4,-1.45 1.4,1.45, height 1.45
SOT230P700X180-4N [mm]
  rect 1.75x0.95 smd: 1(-3.15,2.3) 2(-3.15,0) 3(-3.15,-2.3)
  rect 1.75x3.2 smd: 4(3.15,0)
  silkscreen extent -4.03,-3.25 1.75,3.25, body extent -3.5,-3.25 3.5,3.25, height 1.68
WE-CBF_0603_L1.6W0.8H0.8_HC [mm] "SMD EMI Suppression Ferrite  Bead, body 1.60x0.80mm"
  rect 0.95x0.7 smd: 1(-0.825,0) 2(0.825,0)
  body extent -0.8,-0.4 0.8,0.4, height 0.8
WL-SMCD_0603 [mm] "SMD Mono-color Chip LED, body 1.6x0.8mm"
  rect 0.8x0.75 smd: 1(-0.8,0) 2(0.8,0)
  silkscreen extent -1.63,-0.4 0.22,0.4, body extent -0.8,-0.4 0.8,0.4, height 0.42

## Part data
C1 C11 C12: "Capacitor Polarised", Manufacturer_Name="Kyocera AVX", Mouser Part Number=581-TPSC107K010S0075, Datasheet Link=https://datasheets.kyocera-avx.com/TPS.pdf, Height=2.8mm, Manufacturer_Part_Number=TPSC107K010S0075, Mouser Price/Stock=https://www.mouser.co.uk/ProductDetail/KYOCERA-AVX/TPSC107K010S0075?qs=06QaI1AeGGYXIlSOad5TiA%3D%3D
C2 C3 C4 C5 C7 C8 C9 C10 C13 C14 C15 C16 C17 C18 C19 C20 C21 C24 C25 C26 C27 C28 C29 C33 C34 C35 C36 C37 C38 C39 C42 C43 C44 C45: library part C, "TYPE / TOLERANCE / VOLTAGE / PACKAGE", Symbol_Valid=20260706
D1 D3 D6 D7 D8: library part D_TVS_UNIDIR, "5V", Symbol_Valid=20260706
D2: library part BAT54W-HG3-08, "Schottky Diode", Manufacturer_Name=Vishay, Mouser Part Number=78-BAT54W-HG3-08, Arrow Part Number=BAT54W-HG3-08, Arrow Price/Stock=https://www.arrow.com/en/products/bat54w-hg3-08/vishay?region=nac, Datasheet Link=https://componentsearchengine.com/Datasheets/1/BAT54W-HG3-08.pdf, Height=1.35mm, Manufacturer_Part_Number=BAT54W-HG3-08, Mouser Price/Stock=https://www.mouser.co.uk/ProductDetail/Vishay-Semiconductors/BAT54W-HG3-08?qs=BJlw7L4Cy79Yn3Vxayemjg%3D%3D
D4 D5: library part 150060GS55040, "WL-SMCD Mono-color Chip LED Diffused, SMT, size 0603, Green, 3.2V, 140°", Case/Size Code=0603, Emitting Color=Green, Forward Voltage=3.2V, Manufacturer="Wurth Elektronik", Operating Temperature Max=85°C, Operating Temperature Min=-40°C, Category="Signal LEDs", Chip Technology=InGaN, ComponentLink1Description="Website Link", ComponentLink1URL=https://www.we-online.com/redexpert/article/150060GS55040?ad, ComponentLink2Description="Datasheet Link", ComponentLink2URL=https://www.we-online.com/redexpert/spec/150060GS55040?ad, Dominant Wavelength=525nm, Height=0.4mm, Length=1.6mm, Luminous Intensity=430mcd, Manufacturer Part Number=150060GS55040, Match Code=WL-SMCD, Mount="Surface Mount", Packaging="Tape and Reel", Peak Wavelength=520nm, Viewing Angle=140°, Width=0.8mm
FB1 FB2: library part FB, Symbol_Valid=20260706
FB3: library part 742792651, "WE-CBF SMT EMI Suppression Ferrite Bead, size 0603, 600Ω, 1A", Case/Size Code=0603, DC Resistance Max=0.2Ω, Manufacturer="Wurth Elektronik", Max Operating Temperature=125°C, Min Operating Temperature=-55°C, Rated Current=1A, Category="Ferrites for PCB Assembly", ComponentLink1Description="Website Link", ComponentLink1URL=https://www.we-online.com/redexpert/article/742792651?ad, ComponentLink2Description="Datasheet Link", ComponentLink2URL=https://www.we-online.com/redexpert/spec/742792651?ad, Height=0.8mm, Impedance @100MHz=600Ω, Impedance Max=800Ω, Impedance Max Test Condition=200MHz, Length=1.6mm, Manufacturer Part Number=742792651, Match Code=WE-CBF, Mount="Surface Mount", Packaging="Tape and Reel", Type="High Current", Width=0.8mm
J1: "WR-PHD Socket Header, SMT, Vertical, pitch 2mm, 2 Row, 14P", Contact Resistance=20mΩ, Manufacturer="Wurth Elektronik", Operating Temperature Max=105°C, Operating Temperature Min=-40°C, Rated Current=2A, Withstanding Voltage=500V, Working Voltage=250V, Category="Board-to-Board Connectors", ComponentLink1Description="Website Link", ComponentLink1URL=https://www.we-online.com/redexpert/article/621014242921?ad, ComponentLink2Description="Datasheet Link", ComponentLink2URL=https://www.we-online.com/redexpert/spec/621014242921?ad, Gender="Socket Header", Manufacturer Part Number=621014242921, Match Code=WR-PHD, Mount="Surface Mount", Number of Pins=14, Number of Rows=2, Orientation=Vertical, Packaging=Tube, Pitch=2mm
J2: "Connector", Manufacturer_Name="JST (JAPAN SOLDERLESS TERMINALS)", Datasheet Link=https://www.jst-mfg.com/product/pdf/eng/ePH.pdf, Height=6mm, Manufacturer_Part_Number=B3B-PH-K-S
J3: "WR-CRD SIM Card Connector Hinge Socket, 6 pins", Manufacturer="Wurth Elektronik", Max Operating Temperature="85 °C", Min Operating Temperature="-25 °C", Application="Nano SIM Card", Category="Input/Output Connector", ComponentLink1Description="Website Link", ComponentLink1URL=https://www.we-online.com/redexpert/article/693042010611?ad, ComponentLink2Description="Datasheet Link", ComponentLink2URL=https://www.we-online.com/redexpert/spec/693042010611?ad, Durability="5000 Mating cycles", Gender=Socket, Manufacturer Part Number=693042010611, Match Code=WR-CRD, Mount="Surface Mount", Number of Pins=6, Packaging="Tape and Reel", Type=Hinge
J5: "WR-SMA Connector, PCB THT Jack, Rear Mount Bulkhead, DC~12.4GHz, 50Ohm", Frequency Range=DC~12.4GHz, Manufacturer="Wurth Elektronik", Operating Temperature Max=165°C, Operating Temperature Min=-65°C, Category="Coaxial Connectors", Center Contact Diameter=1.27mm, ComponentLink1Description="Website Link", ComponentLink1URL=https://www.we-online.com/redexpert/article/60311042114502?ad, ComponentLink2Description="Datasheet Link", ComponentLink2URL=https://www.we-online.com/redexpert/spec/60311042114502?ad, Connector Type=SMA, Gender=Jack, Impedance=50Ohm, Interface Type=MIL-STD-348, Manufacturer Part Number=60311042114502, Match Code=WR-SMA, Mount="Through Hole", Orientation="Right Angle", Packaging=Tray
J6: "WR-COM Mini USB 2.0 Type B SMT Horizontal 5 Contacts", Manufacturer="Wurth Elektronik", Operating Temperature Max=105°C, Operating Temperature Min=-40°C, Rated Current=1A, Working Voltage="30V (AC)", Application="Mini USB 2.0", Category="Input/Output Connectors", ComponentLink1Description="Website Link", ComponentLink1URL=https://www.we-online.com/redexpert/article/65100516121?ad, ComponentLink2Description="Datasheet Link", ComponentLink2URL=https://www.we-online.com/redexpert/spec/65100516121?ad, Gender=Receptacle, Interface Type="Type B", Manufacturer Part Number=65100516121, Match Code=WR-USB, Mount="Surface Mount", Number of Pins=5, Number of Ports=1, Orientation=Horizontal, Packaging="Tape and Reel & Mylar"
P1 P2: "WR-PHD Pin Header, THT, Vertical, pitch 2.54mm, 1 Row, 3P", Contact Resistance=20mΩ, Manufacturer="Wurth Elektronik", Operating Temperature Max=105°C, Operating Temperature Min=-40°C, Rated Current=3A, Withstanding Voltage=500V, Working Voltage=250V, Category="Board-to-Board Connectors", ComponentLink1Description="Website Link", ComponentLink1URL=https://www.we-online.com/redexpert/article/61300311121?ad, ComponentLink2Description="Datasheet Link", ComponentLink2URL=https://www.we-online.com/redexpert/spec/61300311121?ad, Gender="Pin Header", Manufacturer Part Number=61300311121, Match Code=WR-PHD, Mount="Through Hole", Number of Pins=3, Number of Rows=1, Orientation=Vertical, Packaging=Bag, Pitch=2.54mm
Q1: library part T_MOS_D_P, "CURRENT / VOLTAGE / RDSON / PACKAGE", Symbol_Valid=20260706
Q2 Q3 Q4 Q5 Q6 Q7 Q8: library part T_MOS_D_N, "CURRENT / VOLTAGE / RDSON / PACKAGE", Symbol_Valid=20260706
R1 R2 R3 R4 R5 R6 R7 R8 R9 R10 R11 R12 R13 R14 R15 R16 R17 R18 R19 R20 R21 R22 R23 R24 R25 R26 R27 R28 R29 R30 R31 R32 R33 R34 R37 R38 R39 R40 R41 R42 R43 R44 R45 R46 R47 R48 R49 R50 R51 R52 R53 R54 R55 R56 R57 R58 R59 R60 R61: library part R, "TOLERANCE / POWER / VOLTAGE / PACKAGE", Symbol_Valid=20260706
U1: "Integrated Circuit", Manufacturer_Name="Espressif Systems", Manufacturer_Part_Number=ESP32-WROOM-32UE(M113EH2800UH3Q0), Mouser Part Number=N/A, Datasheet Link=https://www.mouser.co.uk/datasheet/2/891/esp32_wroom_32e_esp32_wroom_32ue_datasheet_en-1855879.pdf, Height=3.35mm, Mouser Price/Stock=https://www.mouser.co.uk/ProductDetail/Espressif-Systems/ESP32-WROOM-32UEM113EH2800UH3Q0?qs=vHuUswq2%252BswmjMZOJoYkgw%3D%3D
U2: library part LM317EMP_NOPB, "Integrated Circuit", Arrow Part Number=LM317EMP/NOPB, Manufacturer_Name="Texas Instruments", Mouser Part Number=926-LM317EMP/NOPB, Arrow Price/Stock=https://www.arrow.com/en/products/lm317empnopb/texas-instruments, Datasheet Link=https://datasheet.datasheetarchive.com/originals/distributors/Datasheets-SFU2/DSASFU100037177.pdf, Height=1.8mm, Manufacturer_Part_Number=LM317EMP/NOPB, Mouser Price/Stock=https://www.mouser.co.uk/ProductDetail/Texas-Instruments/LM317EMP-NOPB?qs=X1J7HmVL2ZHVCQuTuwGwvw%3D%3D
U3: "Integrated Circuit", Arrow Part Number=MCP73833-AMI/UN, Manufacturer_Name=Microchip, Mouser Part Number=579-MCP73833-AMI/UN, Arrow Price/Stock=https://www.arrow.com/en/products/mcp73833-amiun_2/microchip-technology.html?utm_currency=USD&region=nac, Datasheet Link=http://componentsearchengine.com/Datasheets/1/MCP73833-AMI_UN.pdf, Height=1.1mm, Manufacturer_Part_Number=MCP73833-AMI/UN, Mouser Price/Stock=https://www.mouser.co.uk/ProductDetail/Microchip-Technology/MCP73833-AMI-UN?qs=Fxu3fLyJv8fd%2FGnsUSC9lg%3D%3D
U4: "Integrated Circuit", Manufacturer_Name=SIMCOM, Manufacturer_Part_Number=A7670C-LNSC, Datasheet Link=https://nostris.ee/pdf/A7670%20Series%20Hardware%20Design_V1.00.pdf, Height=2.77mm
U5: "Integrated Circuit", Manufacturer_Name=STMicroelectronics, Mouser Part Number=511-ESDA6V1W5, Arrow Part Number=ESDA6V1W5, Arrow Price/Stock=https://www.arrow.com/en/products/esda6v1w5/stmicroelectronics.html?utm_currency=USD&region=nac, Datasheet Link=https://www.st.com/resource/en/datasheet/esdaxxxwx.pdf, Height=1.1mm, Manufacturer_Part_Number=ESDA6V1W5, Mouser Price/Stock=https://www.mouser.co.uk/ProductDetail/STMicroelectronics/ESDA6V1W5?qs=9NrABl3fj%2FrhT5vdkOmqXg%3D%3D
U6: "Integrated Circuit", Manufacturer_Name="Texas Instruments", Mouser Part Number=595-74LVC1G125DBVRE4, Arrow Part Number=74LVC1G125DBVRE4, Arrow Price/Stock=https://www.arrow.com/en/products/74lvc1g125dbvre4/texas-instruments?utm_currency=USD&region=nac, Datasheet Link=https://www.ti.com/lit/ds/symlink/sn74lvc1g125.pdf?ts=1638417397474&ref_url=https%253A%252F%252Fwww.google.com%252F, Height=1.45mm, Manufacturer_Part_Number=74LVC1G125DBVRE4, Mouser Price/Stock=https://www.mouser.co.uk/ProductDetail/Texas-Instruments/74LVC1G125DBVRE4?qs=pajgIaoyDUg%2FeHLuOYECCA%3D%3D
U7 U8 U9: "Undefined or Miscellaneous", Manufacturer_Name=onsemi, Mouser Part Number=512-NC7WZ07P6, Arrow Part Number=NC7WZ07P6, Arrow Price/Stock=https://www.arrow.com/en/products/nc7wz07p6/on-semiconductor, Datasheet Link=https://componentsearchengine.com/Datasheets/2/NC7WZ07P6.pdf, Height=1.1mm, Manufacturer_Part_Number=NC7WZ07P6, Mouser Price/Stock=https://www.mouser.co.uk/ProductDetail/onsemi-Fairchild/NC7WZ07P6?qs=lI63Maeh00G%252BzlGPlSifpQ%3D%3D

## Free pads (board coordinates)
  round 0 hole 3.2 unplated: 3(4.2,8) 3(4.2,30) 3(21.7,40.3) 3(48.8,41.8) 3(56.3,46.3) 3(61.5,4.8)
  rrect50% 1.65x1.65 hole 1.1: 4(46.355,46.669)
  round 1.65 hole 1.1: 4(46.355,54.169)

## Via types
v1: diameter 0.7, hole 0.3, Top Layer to Bottom Layer, tented both sides, 176 vias

## Nets (pads, with @x,y where several pads share a name; then routed paths per layer and width w, separated by ;. In a path a pad name is that pad's centre, name@x,y a point inside that pad or via, vN(x,y) a via of type N, cw(c..) or ccw(c..) an arc to the next point about the centre after c; other vN are vias at no path point)
+1.8V: C43.1 C45.1 R24.1 R41.2 R46.1 R47.1 R49.2 R50.2 R51.2 U4.15 U7.5 U9.5 | length 24.7
  Top Layer w0.15: R51.2@40.64,35.711 41.552,34.798 42.418,34.798 42.545,34.671 U7.5@42.545,33.848 ; U9.5@48.387,35.748 48.387,36.792 49.06,37.465 C45.1@49.123,37.465 ; v1@50.328,37.465 v1(50.398,37.535)
  Top Layer w0.5: v1(26.797,5.461) R47.1@28.424,5.461 ; v1(26.797,6.985) R46.1@28.424,6.985 ; v1(35.722,31.447) 35.722,31.501 36.195,31.975 R50.2@36.195,33.25 ; v1(39.116,36.195) 39.163,36.195 39.648,35.711 R51.2@40.64,35.711 ; v1(39.243,28.575) 39.212,28.606 39.212,32.862 v1(39.243,32.893) ; C43.1@43.535,37.465 v1(44.704,37.465) R49.2@44.704,35.711 ; C45.1@49.123,37.465 49.158,37.5 50.363,37.5 v1(50.398,37.535) ; R41.2@51.943,35.711 v1(51.943,36.83)
  Bottom Layer w0.15: v1@50.352,37.489 v1(50.398,37.535)
  Bottom Layer w0.5: v1(40.386,8.89) 41.529,10.033 R24.1@41.529,11.025
+3.3V: C7.1 C44.1 D1.2 FB1.1 R3.2 R9.1 R15.1 R21.1 R27.1 R29.1 R30.2 R52.2 R53.2 R55.2 U6.2 U6.5 U8.5 | length 54.5
  Top Layer w0.15: v1(31.496,35.179) 32.74,35.179 C44.1@32.766,35.205 32.766,34.313 R52.2@32.107,33.655 32.42,33.343 32.42,32.985 32.639,32.766 34.417,32.766 34.671,33.02 34.671,34.059 34.529,34.201 U8.5@34.529,35.052 ; R53.2@46.228,33.885 47.14,34.798 49.38,34.798 R55.2@50.292,33.885 50.292,33.115 49.911,32.734 v1(49.911,32.639)
  Top Layer w0.5: R29.1@7.644,29.21 v1(9.271,29.21) v1(10.414,29.21) ; v1(8.763,10.033) v1(8.763,9.144) D1.2@8.763,8.058 8.763,7.366 10.402,5.727 FB1.1@10.516,5.727 FB1.1@10.643,5.727 ; v1(12.7,30.099) v1(12.7,31.496) 14.502,33.298 R27.1@14.502,37.592
  Bottom Layer w0.15: R21.1@21.983,50.304 v1@26.658,50.304 ; U6.5@34.397,55.565 38.034,55.565 38.481,55.118 38.481,52.348 R30.2@37.441,51.308 ; v1(59.817,48.641) 59.795,48.619 59.795,47.697 R15.1@60.87,46.622
  Bottom Layer w0.5: R21.1@21.971,50.316 R21.1@21.983,50.304 ; v1@26.658,50.304 v1(26.67,50.292) ; v1@29.41,53.086 v1(29.464,53.086) 30.084,53.086 30.377,52.793 R9.1@30.377,51.689 ; v1(29.972,54.356) C7.1@29.972,55.525 29.972,55.588 30.849,56.465 31.847,56.465 U6.2@31.897,56.515 ; v1(30.988,53.848) R3.2@32.234,53.848 ; U6.5@34.397,55.565 34.407,55.575 34.407,56.505 v1(34.417,56.515)
BOOT: R60.1 U1.27 | length 6.7
  Top Layer w0.15: v1(26.797,29.21) 26.797,27.555 U1.27@26.827,27.525
  Bottom Layer w0.15: R60.1@23.852,25.908 23.852,27.027 25.969,29.144 26.731,29.144 v1(26.797,29.21)
CHG_PG: R30.1 U1.38 U3.7 | length 47.5
  Top Layer w0.15: U1.38@12.857,27.525 12.827,27.495 12.827,26.289 13.335,25.781 v1(14.224,25.781)
  Layer 2 w0.15: v1(14.224,25.781) 17.356,25.781 25.273,33.698 25.273,41.783 34.098,50.608 v1(35.879,50.608)
  Bottom Layer w0.15: v1(35.879,50.608) 37.883,50.608 38.567,50.608 R30.1@39.267,51.308 39.267,54.126 39.616,54.475 U3.7@40.554,54.475
CHG_RST: R13.1 U1.39 | length 49.1
  Top Layer w0.15: U1.39@11.587,27.525 11.684,27.622 v1(11.684,28.956)
  Layer 3 w0.15: v1(6.731,30.099) 10.541,30.099 v1(11.684,28.956)
  Bottom Layer w0.15: v1(6.731,30.099) 6.731,30.607 7.553,31.429 7.553,33.588 10.795,36.83 22.533,36.83 24.772,39.069 24.772,41.531 23.031,43.272 20.609,43.272 20.193,43.688 20.193,51.181 20.701,51.689 R13.1@23.447,51.689
CHG_STAT_2: J1.1 J1.M1 R3.1 U3.4 | length 83.7
  Layer 2 w0.15: J1.M1@5.445,12.923 5.461,12.907 5.461,11.557 5.08,11.176 1.27,11.176 0.762,11.684 0.762,25.4 2.413,27.051 4.699,27.051 8.128,30.48 v1(8.128,31.115)
  Bottom Layer w0.15: v1(8.128,31.115) 8.128,32.427 8.001,32.554 8.001,33.612 10.919,36.53 22.657,36.53 23.338,37.211 23.368,37.211 25.146,38.989 25.146,41.581 23.155,43.572 20.828,43.572 20.574,43.826 20.574,48.895 21.082,49.403 30.353,49.403 31.115,50.165 34.06,53.11 R3.1@34.06,53.848 34.074,53.862 34.685,53.862 35.298,54.475 U3.4@36.154,54.475
ESP_DBG_USB_DN: R58.1 U1.13 | length 57.6
  Top Layer w0.15: v1(25.527,11.303) 25.527,10.055 U1.13@25.557,10.025 ; v1(54.229,32.639) 54.378,32.639 54.586,32.847 59.058,32.847 59.439,32.466 60.213,32.466 60.925,33.177 60.925,33.723 R58.1@61.087,33.885
  Layer 3 w0.15: v1(25.527,11.303) 25.908,11.684 25.908,13.124 27.513,14.729 27.513,21.46 32.896,26.843 54.867,26.843 55.515,27.491 55.515,32.831 55.427,32.919 54.592,32.919 54.312,32.639 v1(54.229,32.639)
ESP_DBG_USB_DP: R59.1 U1.14 | length 57.4
  Top Layer w0.15: v1(26.543,11.303) 26.543,11.245 26.827,10.961 U1.14@26.827,10.025 ; v1(54.229,33.528) 54.61,33.147 59.182,33.147 59.563,32.766 60.089,32.766 60.208,32.885 60.208,33.01 59.99,33.228 59.99,33.485 59.844,33.631 R59.1@59.813,33.631
  Layer 3 w0.15: v1(26.543,11.303) 26.543,11.446 26.208,11.781 26.208,13 27.813,14.605 27.813,21.336 33.02,26.543 54.991,26.543 55.815,27.367 55.815,32.956 55.496,33.274 54.592,33.274 54.338,33.528 v1(54.229,33.528)
ESP_LED: R31.1 U1.26 | length 13.2
  Top Layer w0.15: U1.26@28.077,25.767 28.091,25.781 v1(29.718,25.781)
  Bottom Layer w0.15: v1(29.718,25.781) 37.338,25.781 39.37,23.749 40.362,23.749 R31.1@40.386,23.725